# Altium PCB Secondary-PCB.PcbDoc
Units mm, origin at the board's own origin, x right, y up, seen from the top; angles counter-clockwise.
Board outline 43.99 x 38.1 mm, 2 copper layers (Top Layer, Bottom Layer), stack 1.448 mm thick; 8 components, 6 nets, 28 pads, 57 vias.
Unrouted connection lines stored in the file: 9.
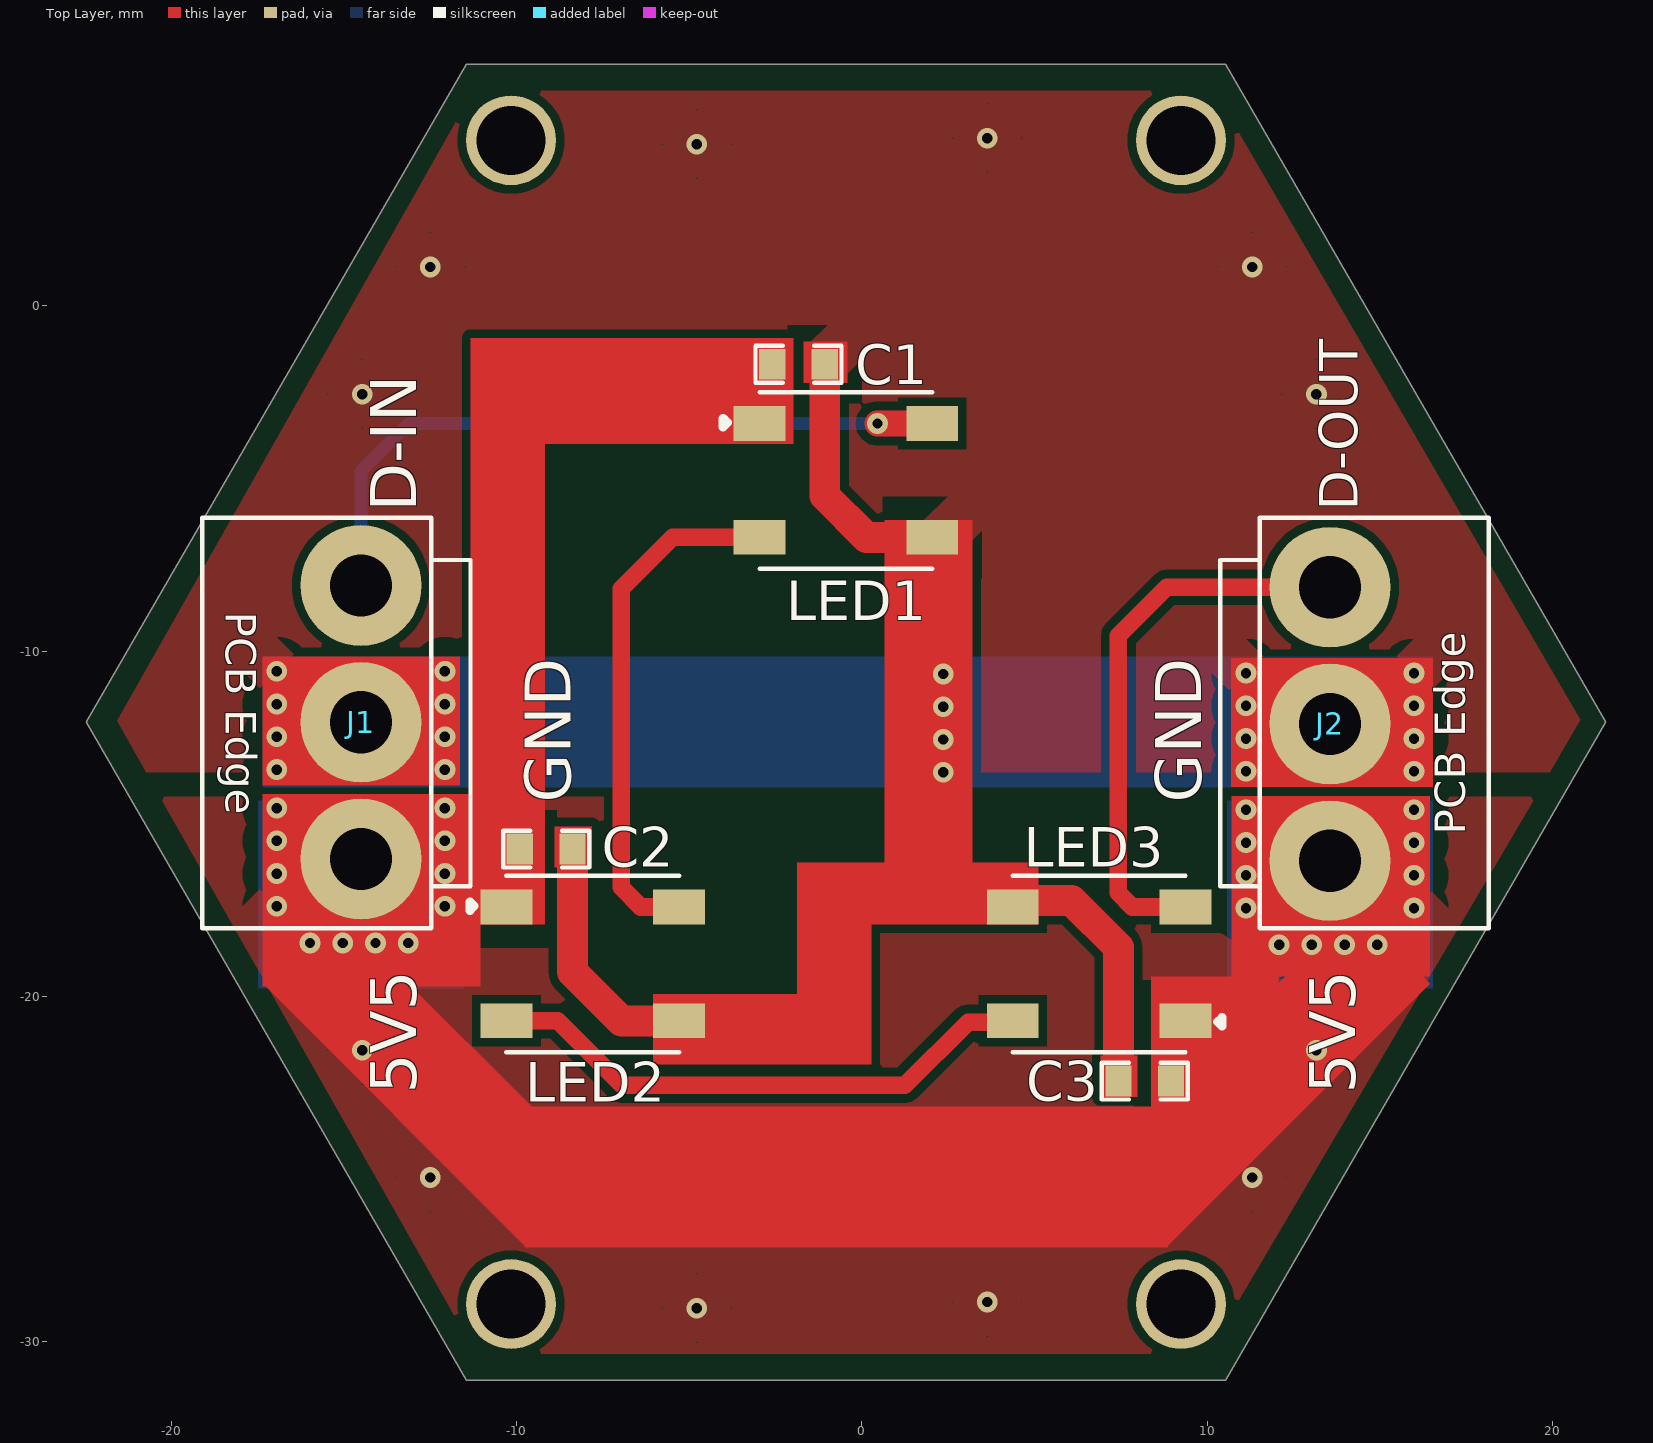
[diagram p0: Top Layer view]
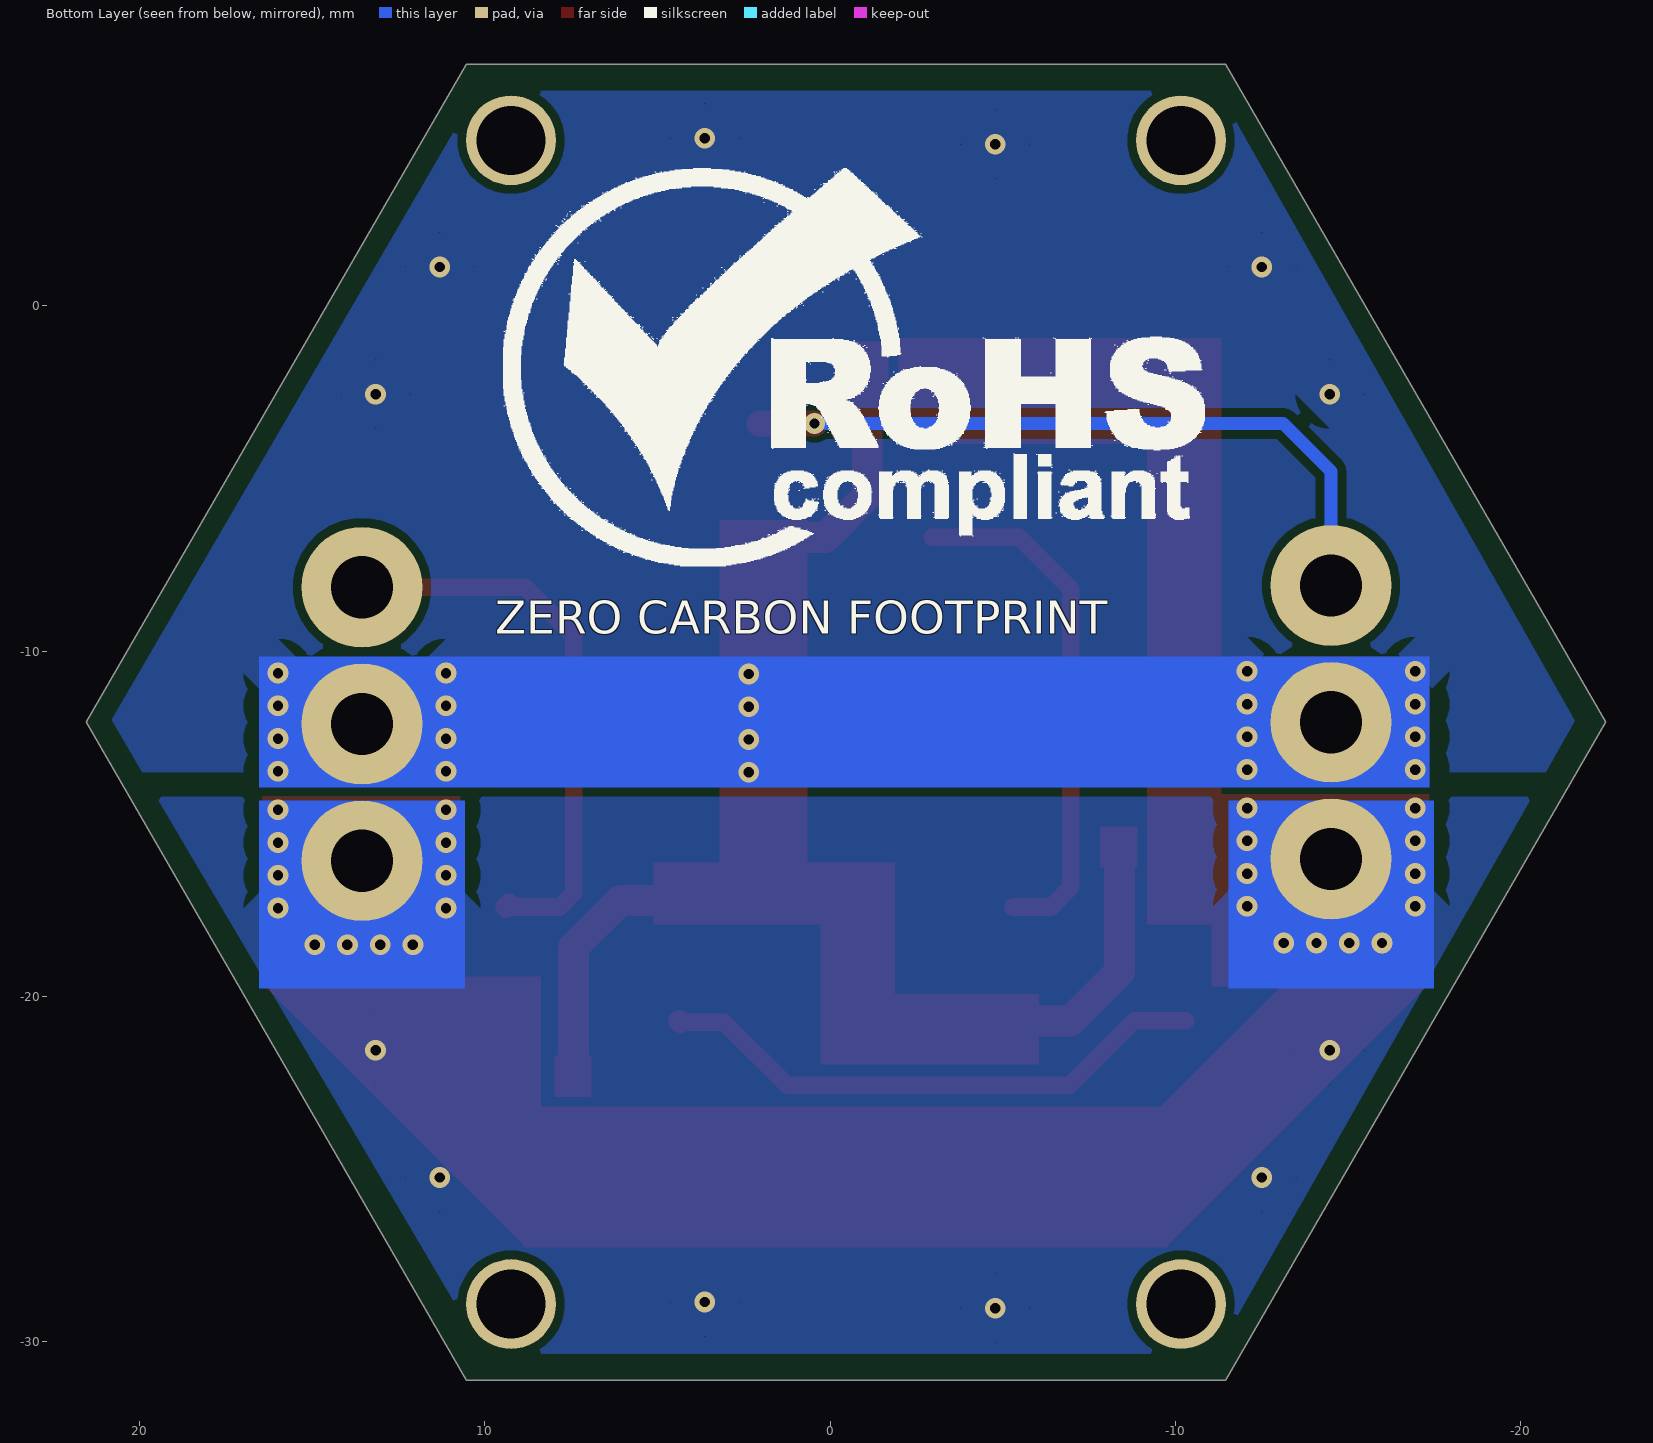
[diagram p1: Bottom Layer view, seen from below]
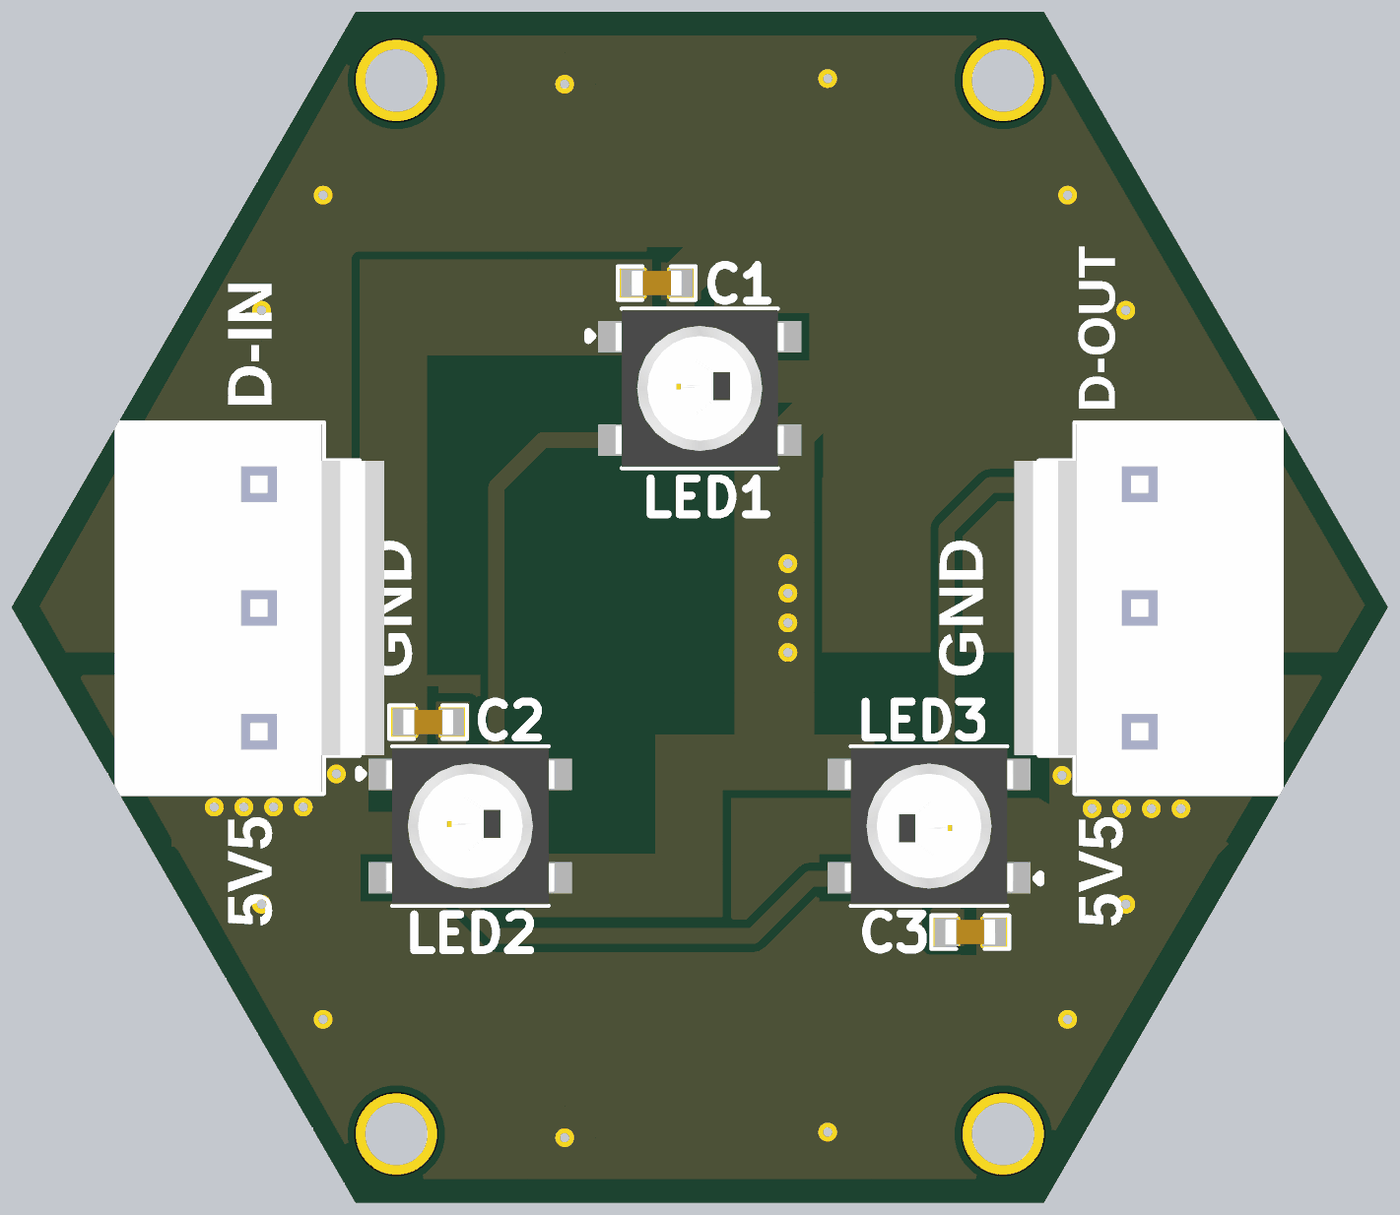
[diagram p2: 3D render of the assembled board from above, using the file's embedded part models]

## Layer stack, top to bottom
Top Solder: solder mask 0.0762, Solder Resist, Dk 3.5
Top Layer: signal copper 0.254
Dielectric 1: dielectric 0.9398, FR-4, Dk 4.8
Bottom Layer: signal copper 0.254
Bottom Solder: solder mask 0.0762, Solder Resist, Dk 3.5

## Board outline
-11.46,-31.105 -22.459,-12.055 -11.46,6.995 10.537,6.995 21.536,-12.055 10.537,-31.105

## Design rules (kind name [scope] priority, off if disabled: settings)
Clearance [All] p1: gap=0.254 ignorepadtopadclearanceinfootprint=FALSE except(0: Arc-Hole Track-Hole SMDPad-Hole THPad-Hole Via-Hole Fill-Hole Poly-Hole Region-Hole Text-Hole)
MinimumSolderMaskSliver [All] p1: minsoldermaskwidth=0
PlaneConnect [All] p1: planeconnectstyle=Relief reliefexpansion=0.508 reliefentries=4 reliefconductorwidth=0.635 reliefairgap=0.254
PolygonConnect [All] p1: connectstyle=Relief reliefconductorwidth=1.397 reliefentries=4 polygonreliefangle="45 Angle" airgapwidth=0.7
RoutingVias [All] p1: holewidth=0.3 width=0.6 viastyle="Through Hole" minholewidth=0.3 minwidth=0.6 maxholewidth=0.8 maxwidth=1.6
SilkToSilkClearance [All] p1: silktosilkclearance=0.025
SilkToSolderMaskClearance [IsPad] p1: minsilkscreentomaskgap=0 clearancetoexposedcopper=TRUE
SolderMaskExpansion SolderMaskExpansion_1 [IsVia] p1: expansion=0 istentingtop=FALSE soldermaskfromhole=TRUE
SolderMaskExpansion [Not IsVia] p2: expansion=0.102 istentingtop=FALSE
UnRoutedNet [All] p1: checkbadconnections=TRUE
Width [All] p1: maxlimit=7.5 minlimit=0.254 preferedwidth=0.635 minimp=50.000000 maximp=50.000000 favimp=50.000000
25 further rules are at their usual default settings.

## Components (designator, comment, footprint, x,y, rotation, side; value= is the part's Value field where it differs from the comment)
C1 "0.1uF" Cap-0603 -1.837,-1.687 r0 top locked
C2 "0.1uF" Cap-0603 -9.142,-15.729 r0 top locked
C3 "0.1uF" Cap-0603 8.189,-22.447 r180 top locked
J1 "B3P-VH(LF)(SN)" B3P-VH(LF)(SN) -14.509,-12.055 r270 top locked
J2 "B3P-VH(LF)(SN)" B3P-VH(LF)(SN) 13.553,-12.106 r90 top locked
LED1 "WS2812B-B/W" WS2812B-B/W -0.464,-5.055 r0 top locked
LED2 "WS2812B-B/W" WS2812B-B/W -7.795,-19.055 r0 top locked
LED3 "WS2812B-B/W" WS2812B-B/W 6.868,-19.055 r180 top locked

## Footprints (in the part's own frame and the unit in brackets; to place one, negate y for a bottom-side part, rotate by r counter-clockwise, add the part's x,y. Pads: shape width x height; smd on the part's side, far side on the other; paste and mask are expansions set on the pad)
B3P-VH(LF)(SN) [mm]
  round 3.5 hole 1.8: 1(-3.96,0) 2(0,0) 3(3.96,0)
  silkscreen extent -5.92,-4.6 5.97,3.18, body extent -5.88,-4.55 5.94,3.95, height 11.45
Cap-0603 [mil]
  rect 30x35 smd mask+2.36: 1(-30,0) 2(30,0)
  silkscreen extent -49,-21 49,21, body extent -32,-16 31,16, height 34
WS2812B-B/W [mm]
  rect 1.5x1 smd: 1(-2.5,1.65) 2(-2.5,-1.65) 3(2.5,-1.65) 4(2.5,1.65)
  silkscreen extent -3.56,-2.55 2.5,2.55, body extent -2.7,-2.5 2.7,2.5, height 1.55

## Part data
C1 C2 C3: library part CC0603KRX5R9BB104, "CAP CER 0.1UF 50V X5R 0603", Capacitance=100nF, Case Code (Imperial)=0603, Case Code (Metric)=1608, Dielectric=X5R, LCSC Part Number=C110022, Manufacturer=Yageo, Max Operating Temperature=85°C, Min Operating Temperature=-55°C, Package Quantity=4000, Supplier Part Number 1=311-4046-1-ND, Tolerance=10%, Voltage Rating=50V, Case/Package=0603, Category="Ceramic Capacitors", ComponentLink1Description=http://www.mouser.com/ds/2/447/Yageo_UPY-GP_NP0_16V-to-50V_9-358835.pdf?src-supplier=Mouser, ComponentLink1URL=http://www.mouser.com/ds/2/447/Yageo_UPY-GP_NP0_16V-to-50V_9-358835.pdf?src-supplier=Mouser, ComponentLink2Description=https://www.yageo.com/upload/media/product/productsearch/datasheet/mlcc/UPY-GPHC_X5R_4V-to-50V_26.pdf?src-supplier=Digi-Key, ComponentLink2URL=https://www.yageo.com/upload/media/product/productsearch/datasheet/mlcc/UPY-GPHC_X5R_4V-to-50V_26.pdf?src-supplier=Digi-Key, ComponentLink3Description=http://www.yageo.com/exep/pages/download/literatures/ProductSelectionGuide%202014_Final_2.pdf?src-supplier=Digi-Key, ComponentLink3URL=http://www.yageo.com/exep/pages/download/literatures/ProductSelectionGuide%202014_Final_2.pdf?src-supplier=Digi-Key, Halogen Free="Halogen Free", Item Type=Capacitor, Lead Free="Lead Free", Length=0.063inch, Manufacturer Part Number=CC0603KRX5R9BB104, Mount="Surface Mount", Packaging="Tape and Reel", Pricing 1="1=0.10000, 10=0.05200, 50=0.02820, 100=0.02310, 500=0.01648, 1000=0.01294 (USD)", RoHS=Yes, Stock 1=152253, Supplier 1=Digi-Key, Termination=SMD/SMT, Thickness=0.035inch, Voltage Rating (DC)=50V, Weight=7.1E-05oz, Width=0.031inch
J1 J2: "1x3P VH 1 3.96mm 3 Brass Plugin,P=3.96mm Wire To Board / Wire To Wire Connector ROHS", LCSC Part Number=C160316, Manufacture="JST Sales America", ComponentLink1Description=LCSC, ComponentLink1URL=https://www.lcsc.com/product-detail/Wire-To-Board-Wire-To-Wire-Connector_JST-Sales-America-B3P-VH-LF-SN_C160316.html, Item Type=Connector, Manufacture part number=B3P-VH(LF)(SN), Pakage=Plugin,P=3.96mm
LED1 LED2 LED3: "RGB SMD5050 Light Emitting Diodes (LED) ROHS", LCSC Part Number=C114586, Manufacturer=Worldsemi, Package=SMD5050, ComponentLink1Description=LCSC, ComponentLink1URL=https://www.lcsc.com/product-detail/Light-Emitting-Diodes-LED_Worldsemi-WS2812B-B-W_C114586.html, Item Type="RGB LED", Manufacturer Part Number=WS2812B-B/W

## Free pads (board coordinates)
  round 2.6 hole 2 unplated mask+0.05: MH(-10.16,-28.905) MH(-10.16,4.795) MH(9.237,-28.905) MH(9.237,4.795)

## Via types
v1: diameter 0.6, hole 0.3, Top Layer to Bottom Layer, 57 vias

## Nets (pads, with @x,y where several pads share a name; then routed paths per layer and width w, separated by ;. In a path a pad name is that pad's centre, name@x,y a point inside that pad or via, vN(x,y) a via of type N, cw(c..) or ccw(c..) an arc to the next point about the centre after c; other vN are vias at no path point)
DATA_OUT1: LED1.2 LED2.4 | length 15.2
  Top Layer w0.508: LED2.4 -6.399,-17.405 -6.965,-16.84 -6.965,-8.196 -5.474,-6.705 LED1.2
DATA_OUT2: LED2.2 LED3.4 | length 16.2
  Top Layer w0.508: LED2.2 -8.805,-20.705 -6.939,-22.571 1.24,-22.571 3.073,-20.737 LED3.4@4.336,-20.737
  Top Layer w0.635: LED3.4@4.336,-20.737 LED3.4
DATA_OUT3: J2.3 LED3.2 | length 16.4
  Top Layer w0.508: LED3.2 7.833,-17.405 7.427,-16.999 7.427,-9.551 8.832,-8.146 J2.3
  Top Layer w0.635: LED3.2@9.294,-17.331 LED3.2
GND: C1.2 C2.2 C3.2 J1.2 J2.2 LED1.3 LED2.3 LED3.3 | length 22.2
  Top Layer w0.635: LED3.3 LED3.3@4.557,-17.216
  Top Layer w0.889: C2.2 -8.38,-19.289 -6.965,-20.705 LED2.3 ; C1.2 -1.075,-5.498 0.131,-6.705 LED1.3 ; LED3.3@4.557,-17.216 6.071,-17.216 7.427,-18.573 C3.2
  other v1: 2.357,-13.503 11.12,-13.478 15.985,-13.478 -16.941,-13.427 -12.076,-13.427 2.357,-12.555 11.12,-12.529 15.985,-12.529 -16.941,-12.479 -12.076,-12.479 2.357,-11.606 11.12,-11.581 15.985,-11.581 -16.941,-11.53 -12.076,-11.53 2.357,-10.658 11.12,-10.633 15.985,-10.633 -16.941,-10.582 -12.076,-10.582 -14.471,-2.555 13.16,-2.555 -12.502,1.127 11.298,1.127 -4.78,4.678 3.627,4.855
HV_LED_DATA: J1.1 LED1.4 | length 20.4
  Top Layer w0.762: v1(0.452,-3.405) LED1.4
  Bottom Layer w0.381: J1.1 -14.509,-4.795 -13.119,-3.405 v1(0.452,-3.405)
VCC_5V: C1.1 C2.1 C3.1 J1.3 J2.1 LED1.1 LED2.1 LED3.1 | length 7.1
  Top Layer w1.27: C2.1@-10.191,-16.015 C2.1 ; 10.661,-21.611 11.425,-20.847 11.425,-18.42 13.553,-16.292 J2.1
  other v1: -4.78,-29.022 3.627,-28.845 -12.502,-25.238 11.298,-25.238 -14.471,-21.555 13.16,-21.555 12.08,-18.499 13.028,-18.499 13.976,-18.499 14.924,-18.499 -15.982,-18.448 -15.033,-18.448 -14.085,-18.448 -13.137,-18.448 11.12,-17.438 15.985,-17.438 -16.941,-17.387 -12.076,-17.387 11.12,-16.489 15.985,-16.489 -16.941,-16.439 -12.076,-16.439 11.12,-15.541 15.985,-15.541 -16.941,-15.49 -12.076,-15.49 11.12,-14.593 15.985,-14.593 -16.941,-14.542 -12.076,-14.542

## Polygon pours and split planes (outlines as drawn)
GND on Top Layer "GND_L01_P000" (solid, remove dead copper, pour order 0): -11.245,6.233 10.199,6.233 20.803,-11.988 19.912,-13.503 -20.727,-13.503 -21.57,-12.016
VCC_5V on Top Layer "VCC_5V_L01_P004" (solid, remove dead copper, pour order 4): -20.323,-14.214 19.5,-14.214 10.004,-30.343 -11.177,-30.343
VCC_5V on Bottom Layer "VCC_5V_L02_P003" (solid, remove dead copper, pour order 3): -20.323,-14.214 19.5,-14.214 10.004,-30.343 -11.177,-30.343
GND on Bottom Layer "GND_L02_P005" (solid, remove dead copper, pour order 5): -11.245,6.233 10.199,6.233 20.803,-11.988 19.912,-13.503 -20.727,-13.503 -21.57,-12.016

## Other copper
Top Layer:
  region net VCC_5V: -9.771,-27.206 -7.658,-25.093 -15.251,-17.499 -17.365,-19.613
  rectangle net GND: -6.045,-21.961 0.274,-19.929
  rectangle net GND: -1.885,-21.961 0.274,-16.119
  region net VCC_5V: 8.86,-27.27 8.86,-23.18 -9.771,-23.18 -9.771,-27.27
  rectangle net GND: -17.353,-13.884 -11.638,-10.15
  region net VCC_5V: -11.045,-14.138 -17.353,-14.138 -17.353,-19.713 -11.045,-19.713
  rectangle net GND: -8.898,-16.262 -7.822,-15.068
  rectangle net VCC_5V: -11.334,-4.003 -1.986,-0.93
  rectangle net GND: -1.694,-2.225 -0.424,-1.032
  rectangle net GND: 6.91,-22.904 7.986,-21.71
  region net VCC_5V: 12.06,-19.421 8.376,-19.421 8.376,-23.333 12.06,-23.333
  region net VCC_5V: 16.454,-19.624 14.252,-17.422 6.632,-25.042 8.834,-27.244
  region net GND: 5.118,-16.119 -1.885,-16.119 -1.885,-17.905 5.118,-17.905
  rectangle net GND: 0.655,-17.905 3.195,-6.205
  region net VCC_5V: 16.445,-14.189 10.708,-14.189 10.708,-19.421 16.445,-19.421
  region net GND: 16.53,-10.201 10.682,-10.201 10.682,-13.935 16.53,-13.935
  rectangle net VCC_5V: -11.334,-17.905 -9.174,-1.006
Bottom Layer:
  rectangle net VCC_5V: -17.486,-19.764 -11.531,-14.316
  rectangle net VCC_5V: 10.575,-19.764 16.53,-14.316
  region net GND: 3.246,-10.15 -17.353,-10.15 -17.353,-13.946 3.246,-13.946
  rectangle net GND: 1.519,-13.946 16.53,-10.15

## Silkscreen, mask and mechanical layers (free items; w line width, h text height)
Top Overlay:
  text "D-OUT" at 14.721,-5.934 h1.91 r90
  text "D-IN" at -12.476,-5.956 h2.29 r90
  text "GND" at -8.004,-14.392 h2.29 r90
  text "GND" at 10.265,-14.392 h2.29 r90
  text "5V5" at -12.476,-22.819 h2.29 r90
  text "5V5" at 14.721,-22.819 h2.29 r90
Bottom Overlay:
  drawing of 3075 lines, arcs and shapes, not listed
  text "ZERO CARBON FOOTPRINT" at 9.698,-9.49 h0.97
Board Outline:
  the board outline again, w0.254
Fabrication:
  drawing of 301 lines, arcs and shapes, not listed
  text "Layer" at 48.669,14.656 h1.52
  text "Name" at 59.08,14.656 h1.52
  text "Material" at 82.696,14.656 h1.52
  text "Thickness" at 104.534,14.656 h1.52
  text "Constant" at 121.04,14.656 h1.52
  text "Board Layer Stack" at 135.514,14.656 h1.52
  text "Top Overlay" at 59.08,11.608 h1.52
  text "Top Solder" at 59.08,8.56 h1.52
  text "Solder Resist" at 82.696,8.56 h1.52
  text "3.00mil" at 104.534,8.56 h1.52
  text "3.5" at 121.04,8.56 h1.52
  text "1" at 48.669,5.512 h1.52
  text "Top Layer" at 59.08,5.512 h1.52
  text "10.00mil" at 104.534,5.512 h1.52
  text "Dielectric 1" at 59.08,2.464 h1.52
  text "FR-4" at 82.696,2.464 h1.52
  text "37.00mil" at 104.534,2.464 h1.52
  text "4.8" at 121.04,2.464 h1.52
  text "2" at 48.669,-0.584 h1.52
  text "Bottom Layer" at 59.08,-0.584 h1.52
  text "10.00mil" at 104.534,-0.584 h1.52
  text "Bottom Solder" at 59.08,-3.632 h1.52
  text "Solder Resist" at 82.696,-3.632 h1.52
  text "3.00mil" at 104.534,-3.632 h1.52
  text "3.5" at 121.04,-3.632 h1.52
  text "Bottom Overlay" at 59.08,-6.68 h1.52
Drill Drawing:
  circle w0.254: c-31.292,33.994 r0.847
  lines w0.254: -32.139,25.95 -31.715,25.95 -31.292,25.527 -30.869,25.95 -30.445,25.95 -30.869,26.374 -30.445,26.797 -30.869,26.797 -31.292,27.22 -31.715,26.797 -32.139,26.797 -31.715,26.374 -32.139,25.95 ; -32.139,29.337 -30.445,29.337 -30.445,31.03 -32.139,31.03 -32.139,29.337
  lines w0.381: -33.657,24.384 148.716,24.384 ; -33.657,35.814 148.716,35.814 ; -19.665,20.574 -19.665,39.624 ; -5.953,20.574 -5.953,39.624 ; 21.979,20.574 21.979,39.624 ; 34.828,20.574 34.828,39.624 ; 53.467,20.574 53.467,39.624 ; 91.556,20.574 91.556,39.624 ; 106.538,20.574 106.538,39.624 ; 125.481,20.574 125.481,39.624 ; -33.657,20.574 148.716,20.574 148.716,39.624 -33.657,39.624 -33.657,20.574
  text "Symbol" at -31.371,36.957 h1.83
  text "Count" at -18.522,36.957 h1.83
  text "Hole Size" at -4.81,36.957 h1.83
  text "Plated" at 23.122,36.957 h1.83
  text "Hole Type" at 35.971,36.957 h1.83
  text "Drill Layer Pair" at 54.61,36.957 h1.83
  text "Via/Pad" at 92.699,36.957 h1.83
  text "Pad Shape" at 107.681,36.957 h1.83
  text "Template" at 126.624,36.957 h1.83
  text "57" at -18.522,33.147 h1.52
  text "11.81mil (0.300mm)" at -4.81,33.147 h1.52
  text "PTH" at 23.122,33.147 h1.52
  text "Round" at 35.971,33.147 h1.52
  text "Top Layer - Bottom Layer" at 54.61,33.147 h1.52
  text "Via" at 92.699,33.147 h1.52
  text "Rounded" at 107.681,33.147 h1.52
  text "v60h30" at 126.624,33.147 h1.52
  text "6" at -18.522,29.337 h1.52
  text "70.87mil (1.800mm)" at -4.81,29.337 h1.52
  text "PTH" at 23.122,29.337 h1.52
  text "Round" at 35.971,29.337 h1.52
  text "Top Layer - Bottom Layer" at 54.61,29.337 h1.52
  text "Pad" at 92.699,29.337 h1.52
  text "Rounded" at 107.681,29.337 h1.52
  text "c350h180" at 126.624,29.337 h1.52
  text "4" at -18.522,25.527 h1.52
  text "78.74mil (2.000mm)" at -4.81,25.527 h1.52
  text "NPTH" at 23.122,25.527 h1.52
  text "Round" at 35.971,25.527 h1.52
  text "Top Layer - Bottom Layer" at 54.61,25.527 h1.52
  text "Pad" at 92.699,25.527 h1.52
  text "Rounded" at 107.681,25.527 h1.52
  text "c260hn200m265" at 126.624,25.527 h1.52
  text "67 Total" at -18.522,21.717 h1.52

## Dimensions
-11.46,-31.105 to -10.16,-28.905 on Dimensions
-10.16,4.795 to -11.46,6.995 on Dimensions
-22.459,-12.055 to 21.536,-12.055 on Dimensions
10.537,6.995 to 10.537,-31.105 on Dimensions
-11.46,6.995 to -11.46,-31.105 on Dimensions

## Text inside footprints (layer, text, board x,y; h text height)
J1: Top Overlay "PCB Edge" at -18.718,-8.855 h1.52 r270
J2: Top Overlay "PCB Edge" at 17.762,-15.306 h1.52 r90